# Altium PCB PCB_ESP_SparkBot_V1.1.pcbdoc (part 2 of 2)
Units mil, origin at the board's own origin, x right, y up, seen from the top; angles counter-clockwise.
Board outline 2353.91 x 3416.24 mil, 2 copper layers (Top Layer, Bottom Layer); 135 components, 107 nets, 461 pads, 252 vias.
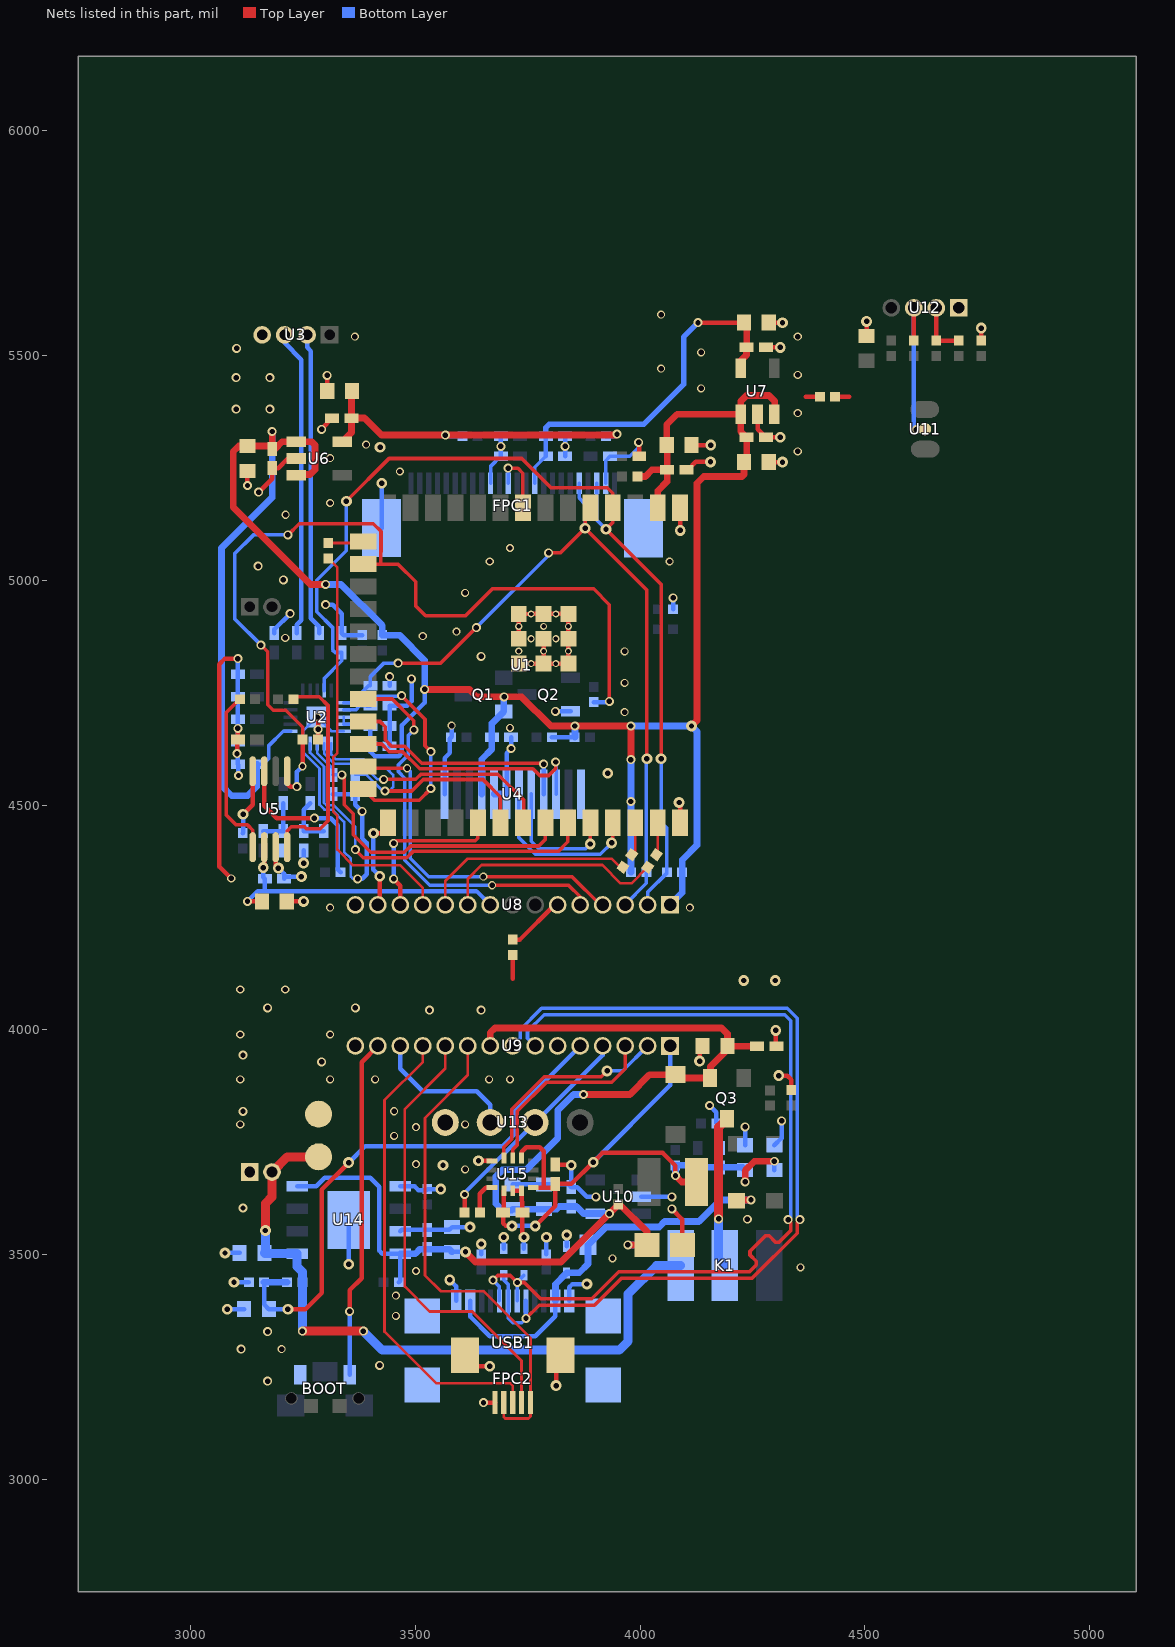
[diagram p2: the nets of this part, all layers, seen from the top]

## Via types
v1: diameter 20, hole 12, Top Layer to Bottom Layer, 106 vias
v2: diameter 24.02, hole 12.01, Top Layer to Bottom Layer, 64 vias
v3: diameter 18, hole 12, Top Layer to Bottom Layer, 57 vias
v4: diameter 20, hole 12.01, Top Layer to Bottom Layer, 12 vias
v5: diameter 15.75, hole 9.84, Top Layer to Bottom Layer, 12 vias
v6: diameter 18, hole 12.01, Top Layer to Bottom Layer, 1 vias

## Nets (pads, with @x,y where several pads share a name; then routed paths per layer and width w, separated by ;. In a path a pad name is that pad's centre, name@x,y a point inside that pad or via, vN(x,y) a via of type N, cw(c..) or ccw(c..) an arc to the next point about the centre after c; other vN are vias at no path point) (continued)
ESP_3V3: C6.2 C7.2 C14.1 C15.1 C20.2 C28.2 C29.2 C36.2 C38.2 C39.2 Q1.2 R3.2 R5.2 R15.2 R16.2 R22.1 R23.1 U1.2 U2.3 U2.4 U2.11 U4.4 U6.1 U6.3 U7.1 U7.3 U8.1 | length 5658.7
  Top Layer w15: v1(3181.82,5331.05) C29.2@3181.82,5292.51 ; U6.3@3235.63,5233.65 3237.43,5235.44 3266.21,5235.44 3276.82,5246.05 3276.82,5301.05 3269.42,5308.45 U6.1@3235.63,5308.45 3204.22,5308.45 3188.28,5292.51 C29.2@3181.82,5292.51 ; v1(3300.82,4991.05) 3266.82,4991.05 3095.02,5162.85 3095.02,5286.05 3107.58,5298.61 C28.2@3126.82,5298.61 3175.72,5298.61 C29.2@3181.82,5292.51 ; v1(3521.07,4757.42) 3620.44,4757.42 3636.82,4741.05 v1(3697.67,4741.05) 3736.82,4741.05 3801.82,4676.05 v1(3855.12,4676.05) v1(3979.78,4676.05) v1(3979.78,4601.06) ; R5.2@3993.86,5231.05 4011.82,5231.05 4026.82,5246.05 C7.2@4060.36,5246.05 ; U1.2@4039.36,5161.43 4039.36,5198.59 4060.36,5219.59 C7.2@4060.36,5246.05 ; v2(4114.49,4676.05) 4126.82,4688.37 4126.82,5216.05 4141.82,5231.05 4226.82,5231.05 4231.14,5235.37 C38.2@4231.14,5263.14 4237.24,5269.24 C39.2@4237.24,5318.14 4223.8,5331.58 U7.1@4223.8,5369.46 ; U7.3@4298.6,5369.46 4299.93,5370.78 4299.93,5397.94 4286.82,5411.05 4236.82,5411.05 4223.8,5398.03 U7.1@4223.8,5369.46 ; C7.2@4060.36,5246.05 4060.36,5299.95 C6.2@4059.26,5301.05 4059.26,5346.05 4082.67,5369.46 U7.1@4223.8,5369.46
  Bottom Layer w6: U2.4@3340.87,4680.3 U2.3@3340.87,4696.05
  Bottom Layer w8: C20.2@3148.28,4591.05 3161.82,4591.05 3173.83,4603.06 3173.83,4631.75 3206.64,4664.55 U2.11@3222.76,4664.55 ; U2.4@3340.87,4680.3 3396.1,4680.3 C15.1@3400.36,4676.05
  Bottom Layer w10: C15.1@3400.36,4676.05 C14.1@3400.36,4631.05 3400.36,4619.16 3410.36,4609.16 3463.13,4609.16 3470.43,4616.46 3470.43,4677.57 3521.07,4728.21 v1(3521.07,4757.42) ; R15.2@3803.86,4651.05 R16.2@3854.78,4651.05
  Bottom Layer w15: C20.2@3148.28,4591.05 3146.82,4589.59 3146.82,4541.05 3126.82,4521.05 3091.82,4521.05 3069.32,4543.55 3069.32,5071.88 3181.82,5184.38 v1(3181.82,5331.05) ; v1(3300.82,4991.05) 3335.07,4991.05 3426.82,4899.3 R3.2@3426.82,4878.09 3464.78,4878.09 3521.07,4821.79 v1(3521.07,4757.42) ; U4.4@3647.92,4524.75 3647.92,4602.15 3670.36,4624.59 C36.2@3670.36,4651.05 3670.36,4681.91 Q1.2@3697.09,4708.65 3697.09,4740.47 v1(3697.67,4741.05) ; R16.2@3854.78,4651.05 3855.12,4651.39 v1(3855.12,4676.05) ; R23.1@3979.78,4351.05 v1(3979.78,4508.06) v1(3979.78,4601.06) ; v1(3979.78,4676.05) v2(4114.49,4676.05) 4126.82,4663.72 4126.82,4411.05 4093.86,4378.09 R22.1@4093.86,4351.05 4093.86,4305.33 U8.1@4066.82,4278.29
GND1: C1.1 C2.1 C3.1 C4.1 C5.1 C6.1 C7.1 C8.1 C10.1 C12.1 C13.1 C14.2 C15.2 C16.1 C19.1 C20.1 C21.1 C22.1 C23.1 C24.1 C25.1 C27.1 C28.1 C29.1 C30.1 C31.1 C32.1 C33.1 C34.1 C36.1 C37.1 C38.1 C39.1 C40.1 C41.1 FPC1.2 FPC1.15 FPC1.25 FPC1.26 Q2.2 R4.1 R8.1 R13.1 R14.1 R40.1 R41.1 U1.1 U1.40 U1.41 U2.5 U2.10 U2.21 U3.4 U4.1 U4.5 U4.6 U4.12 U5.7 U6.2 U7.2 U8.6 U8.15 | length 4279.8
  Top Layer w10: v3(3090.82,4337.05) 3064.33,4363.54 3064.33,4813.56 3076.82,4826.05 v1(3105.36,4826.05) ; v1(3103.59,4614.75) 3103.59,4639.28 3110.36,4646.05 C32.1@3115.36,4646.05 ; C32.1@3105.36,4646.05 v1(3105.36,4671) ; v1(3126.82,5211.05) C28.1@3126.82,5243.49 ; v1(3151.82,5196.05) 3181.82,5226.05 C29.1@3181.82,5249.59 3195.36,5249.59 3216.82,5271.05 U6.2@3235.63,5271.05 ; U5.7@3189.61,4406.56 3189.61,4366.05 v2(3195.71,4359.94) ; C34.1@3214.38,4286.05 v2(3251.82,4286.05) ; v6(3281.82,4696.05) 3283.86,4694.02 v1(3283.86,4668.75) R14.1@3283.86,4646.05 ; v1(3291.82,5336.05) 3291.82,5337.51 C30.1@3315.36,5361.05 ; C31.1@3304.26,5421.05 v1(3304.26,5456.05) ; R40.1@3716.82,4201.04 3732.96,4201.04 3810.21,4278.29 U8.6@3816.82,4278.29 ; U1.41@3730.32,4870.08 v5(3730.32,4897.65) U1.41@3730.32,4925.2 v5(3757.88,4925.21) ; U1.41@3730.32,4814.96 v5(3757.88,4814.97) U1.41@3785.44,4814.96 ; v5(3757.88,4925.21) U1.41@3785.44,4925.2 v5(3813,4925.21) U1.41@3840.56,4925.2 v5(3840.56,4897.65) U1.41@3840.56,4870.08 v5(3840.56,4842.53) U1.41@3840.56,4814.96 v5(3813,4814.97) U1.41@3785.44,4814.96 ; U1.41@3785.44,4870.08 v5(3785.44,4842.53) U1.41@3785.44,4814.96 ; v4(3996.82,5307.1) 3998.28,5305.64 C19.1@3998.28,5276.05 ; v2(4086.82,4506.05) 4089.36,4503.5 U1.40@4089.36,4460.66 ; v2(4089.36,5111.05) U1.1@4089.36,5161.43 ; C7.1@4103.28,5246.05 4106.82,5246.05 4124.27,5263.5 v2(4156.82,5263.5) ; C6.1@4114.38,5301.05 4156.93,5301.05 v2(4157.15,5300.83) ; U7.2@4261.2,5369.46 4261.82,5368.84 4261.82,5336.49 C39.1@4280.16,5318.14 v2(4311.82,5318.14) ; C40.1@4280.16,5518.14 v2(4311.82,5518.14) ; C38.1@4286.26,5263.14 v2(4316.82,5263.14) ; C41.1@4286.26,5573.14 v2(4316.82,5573.14) ; 4368.82,5408 R41.1@4399.78,5408
  Bottom Layer w6: U2.5@3340.87,4664.55 3313.32,4664.55 v6(3281.82,4696.05) 3250.33,4664.56 U2.10@3250.33,4637 3250.33,4618.39 3287.19,4581.54 3287.19,4501.16 3298.32,4490.03 3314.43,4490.03 3341.82,4462.64 3341.82,4396.05 3356.82,4381.05 3356.82,4341.05 3361.82,4336.05 v1(3371.82,4336.05)
  Bottom Layer w8: FPC1.15@3667.59,5215.89 3667.59,5253.28 C3.1@3690.36,5276.05 ; FPC1.2@3923.49,5215.89 3923.49,5266.26 C1.1@3933.28,5276.05 3976.82,5276.05 3996.82,5296.05 v4(3996.82,5307.1)
  Bottom Layer w10: v1(3103.59,4614.75) 3105.36,4612.98 C20.1@3105.36,4591.05 3106.82,4589.59 v1(3106.82,4566.05) ; C22.1@3105.36,4641.05 v1(3105.36,4671) C21.1@3105.36,4691.05 C16.1@3105.36,4741.05 C13.1@3105.36,4791.05 v1(3105.36,4826.05) ; C12.1@3186.82,4882.51 3186.82,4891.05 v1(3221.82,4926.05) ; v2(3195.71,4359.94) 3208.28,4347.38 C33.1@3208.28,4336.05 3213.28,4341.05 v2(3246.82,4341.05) ; v2(3251.82,4371.05) C27.1@3251.82,4399.59 ; v1(3300.82,4946.05) 3316.82,4946.05 3336.82,4926.05 C10.1@3336.82,4882.51 3341.24,4878.09 R4.1@3381.82,4878.09 ; C25.1@3316.82,4524.59 C24.1@3366.82,4524.59 3366.82,4501.05 v1(3381.82,4486.05) 3381.82,4426.05 3391.82,4416.05 3391.82,4346.05 3381.82,4336.05 v1(3371.82,4336.05) ; FPC1.26@3425.44,5116.47 v2(3425.44,5216.05) ; C14.2@3443.28,4631.05 C15.2@3443.28,4676.05 C23.1@3443.28,4721.05 3481.82,4721.05 3491.82,4731.05 v1(3491.82,4781.05) ; C8.1@3443.28,4766.05 v1(3443.28,4786.05) ; U4.1@3565.24,4524.75 3565.24,4604.47 3576.82,4616.05 3576.82,4648.09 R13.1@3579.78,4651.05 3580.82,4652.09 v3(3580.82,4677.05) ; C3.1@3690.36,5276.05 v1(3690.36,5297.95) C2.1@3690.36,5321.05 ; U4.6@3703.04,4524.75 3703.04,4615.81 v1(3713.28,4626.05) C36.1@3713.28,4651.05 ; v1(3811.82,4708.65) Q2.2@3845.44,4708.65 ; C5.1@3833.28,5276.05 v1(3833.28,5297.91) C4.1@3833.28,5321.05 ; R8.1@4073.86,4936.05 v1(4073.86,4961.05)
  Bottom Layer w15: U4.5@3675.48,4524.75 U4.6@3703.04,4524.75
  other v1: 3646.82,4831.05 3206.82,5001.05 3150.82,5031.44 3101.82,5381.05 3176.82,5381.05 3101.82,5451.05 3176.82,5451.05 3102.92,5516.05
  other v2: 3928.39,4571.05 3421.82,5296.05
  other v3: 3310.82,4272.05 4110.82,4272.05 3710.82,4672.05 3965.82,4707.05 3965.82,4772.05 3965.82,4842.05 3210.82,4872.05 3516.82,4876.05 3591.82,4886.05 3610.82,4972.05 3665.82,5042.05 4065.82,5042.05 3710.82,5072.05 3211.82,5146.05 3310.82,5172.05 3465.82,5242.05 3310.82,5272.05 4350.82,5287.05 3390.82,5302.05 4350.82,5372.05 4135.82,5427.05 4350.82,5457.05 4046.82,5471.05 4135.82,5507.05 3365.82,5542.05 4350.82,5542.05 4046.82,5591.05
  other v5: 3730.32,4842.53 3757.88,4870.09 3813,4870.09 3785.44,4897.65
GND2: B-.1 BOOT.1 C42.1 C43.1 C44.1 C45.1 C47.1 C48.1 C49.1 C51.1 C52.1 C53.1 C54.1 C55.1 C56.1 C57.1 C58.1 CN2.1 ESD1.1 ESD2.1 ESD3.1 FPC2.5 FPC2.6 FPC2.7 R21.2 R27.2 R30.1 R34.1 R38.2 R39.2 R40.2 U9.6 U9.15 U10.2 U13.4 U14.1 U14.3 U14.9 U15.1 U15.6 U15.7 USB1.13 USB1.14 USB1.15 USB1.16 USB1.A1B12 USB1.B1A12 | length 1797.5
  Top Layer w10: FPC2.6@3620.36,3276.76 3620.36,3260.45 3628.82,3252 v2(3665.82,3252) ; v2(3640.76,3709) 3670.28,3709 U15.1@3670.76,3708.53 ; v1(3651.82,3171.24) FPC2.5@3677.45,3171.24 ; U15.6@3716.82,3642.78 U15.7@3736.51,3642.78 3736.51,3619.31 3738.28,3617.54 C56.1@3738.28,3594 3738.28,3542.54 v2(3741.82,3539) ; 3716.82,4114 R40.2@3716.82,4166.96 ; C58.1@3811.82,3700.46 3845.36,3700.46 v2(3846.82,3699) ; v2(3813.27,3209) FPC2.7@3813.27,3276.76 ; v1(4070.82,3602) 4094.19,3578.63 C42.1@4094.19,3522 ; v2(4132.5,3930.76) 4132.5,3957.24 C52.1@4139.26,3964 ; v2(4301.82,3999) 4301.82,3965.46 C51.1@4303.28,3964 ; v2(4308.4,3898.49) 4327.33,3898.49 4336.82,3889 R38.2@4336.82,3866.04
  Bottom Layer w10: v2(3076.82,3504) C57.1@3109.26,3504 ; v2(3081.82,3379) C55.1@3119.26,3379 ; v2(3096.82,3439) R39.2@3129.78,3439 ; v2(3352.04,3479) U14.9@3352.04,3577.36 ; U14.3@3466.54,3552.36 3469.64,3555.46 C54.1@3526.82,3555.46 3575.72,3555.46 C53.1@3581.82,3561.56 v2(3621.82,3561.56) ; U14.1@3466.54,3652.36 3498.46,3652.36 3506.82,3644 3524.78,3644 R34.1@3526.82,3646.04 v2(3556.82,3646.04) ; v2(3576.82,3444) 3590.83,3429.99 USB1.B1A12@3590.83,3397.69 ; R27.2@3646.82,3501.04 v2(3646.82,3524) ; ESD3.1@3696.82,3513.53 v2(3696.82,3539) ; C43.1@3716.82,3656.56 C44.1@3786.82,3656.56 3840.72,3656.56 C45.1@3846.82,3650.46 ; ESD2.1@3741.82,3513.53 v2(3741.82,3539) ; R21.2@3791.82,3501.04 v2(3791.82,3539) ; ESD1.1@3836.82,3518.53 v2(3836.82,3544) ; USB1.A1B12@3842.8,3397.7 3842.8,3427.99 3848.82,3434 3880.82,3434 v2(3881.82,3435) ; v2(3846.82,3699) C45.1@3846.82,3650.46 ; v1(3901.82,3629) 3881.82,3629 3860.36,3650.46 C45.1@3846.82,3650.46 ; U10.2@4003,3629 v1(4070.82,3629) ; v1(4154.82,3832) 4169.86,3816.96 R30.1@4169.86,3792 ; C48.1@4233.82,3743.56 v1(4233.82,3784.71) ; C49.1@4298.82,3743.56 4314.82,3759.56 v1(4314.82,3798)
  other v1: 3171.82,3219 3420.87,3254 3112.82,3290 3171.82,3329 4238.82,3579 3116.82,3604 3116.82,3819 3291.82,3929 3116.82,3944 3531.82,4044 3646.82,4044 3171.82,4049 3366.82,4049
  other v2: 3561.82,3699 4230.82,4110 4300.82,4110
  other v3: 3202.82,3290 3456.82,3364 3456.82,3409 3501.82,3464 4356.82,3472 3938.82,3492 3610.82,3690 3501.82,3701.52 3453.05,3764.39 3501.82,3784 3110.82,3790 3610.82,3790 3453.05,3819.24 3110.82,3890 3310.82,3890 3410.82,3890 3664.27,3890 3710.82,3890 3110.82,3990 3310.82,3990 3110.82,4090 3210.82,4090
GND3: C50.1 R32.1 R41.2 U12.1 | length 91.4
  Top Layer w10: R41.2@4433.86,5408 4464.82,5408 ; C50.1@4503.91,5543.61 v2(4503.91,5576.05) ; R32.1@4758.91,5533.09 v2(4758.91,5561.05)
GPIO0: U1.27 U8.14 | length 219.4
  Top Layer w10: v2(3407.12,4437.38) 3428.15,4437.38 3439.36,4448.59 U1.27@3439.36,4460.66 ; U8.14@3416.82,4278.29 3414.21,4278.29 3421.23,4285.31 v2(3421.23,4341.98)
  Bottom Layer w10: v2(3407.12,4437.38) 3407.12,4356.09 v2(3421.23,4341.98)
GPIO1: R7.1 U1.39 | length 71.8
  Top Layer w6: R7.1@4036.59,4390.01 4039.36,4392.78 U1.39@4039.36,4460.66
GPIO2: R9.1 U1.38 | length 73.9
  Top Layer w6: R9.1@3981.59,4390.01 3989.36,4397.78 U1.38@3989.36,4460.66
GPIO3: R10.1 U1.15 | length 78.7
  Top Layer w6: R10.1@3306.82,5083.09 3381.32,5083.09 U1.15@3384.27,5086.04
GPIO4: C10.2 FPC1.3 R22.2 U1.4 U2.19 U8.2 | length 2266.7
  Top Layer w8: v2(3346.82,5176.05) 3441.82,5271.05 3736.82,5271.05 3801.82,5206.05 3926.82,5206.05 3939.36,5193.5 U1.4@3939.36,5161.43 3939.36,5128.59 v2(3924.32,5113.55) 4046.82,4991.05 v2(4046.82,4603.06)
  Bottom Layer w8: U2.19@3297.56,4755.11 3297.56,4781.79 3336.82,4821.05 C10.2@3336.82,4839.59 3321.82,4839.59 3316.16,4845.24 3316.16,4895.09 3280.82,4930.43 3280.82,5000.05 3346.82,5066.05 v2(3346.82,5176.05) ; FPC1.3@3903.79,5215.89 3903.79,5134.07 v2(3924.32,5113.55) ; U8.2@4016.82,4278.29 4016.82,4306.05 4059.78,4349.01 R22.2@4059.78,4351.05 4059.78,4448.09 4046.82,4461.05 v2(4046.82,4603.06)
GPIO5: C8.2 FPC1.5 R23.2 U1.5 U2.1 U8.3 | length 1782.8
  Top Layer w8: v1(3461.82,4816.05) 3556.82,4816.05 v1(3635.75,4894.98) ; v1(3796.82,5061.05) 3822.8,5061.05 v2(3877.8,5116.05) ; U1.5@3889.36,5161.43 3877.8,5149.87 v2(3877.8,5116.05) ; v2(4015.29,4603.06) 4015.29,4978.56 v2(3877.8,5116.05)
  Bottom Layer w8: U2.1@3340.87,4727.55 3358.32,4727.55 3396.82,4766.05 C8.2@3400.36,4766.05 3400.36,4786.05 3430.36,4816.05 v1(3461.82,4816.05) ; v1(3635.75,4894.98) 3796.82,5056.05 v1(3796.82,5061.05) ; FPC1.5@3864.49,5215.89 3864.49,5183.37 3877.8,5170.06 v2(3877.8,5116.05) ; U8.3@3966.82,4278.29 3966.82,4279.01 4013.86,4326.05 R23.2@4013.86,4351.05 4013.86,4601.64 v2(4015.29,4603.06)
GPIO14: U1.22 U8.5 | length 904.4
  Top Layer w8: U1.22@3384.27,4736.04 3448.81,4736.04 3496.82,4688.03 v1(3496.82,4667.59) ; v3(3670.89,4321.98) 3840.89,4321.98 3866.82,4296.05 U8.5@3866.82,4278.29
  Bottom Layer w8: v1(3496.82,4667.59) 3484.29,4655.06 3484.29,4611.46 3462.86,4590.03 3462.86,4574.29 3476.95,4560.2 3476.95,4377.18 3532.15,4321.98 v3(3670.89,4321.98)
GPIO15: FPC1.13 U1.8 | length 147.8
  Top Layer w8: v1(3706.78,5249.43) 3728.43,5249.43 3739.36,5238.5 U1.8@3739.36,5161.43
  Bottom Layer w8: v1(3706.78,5249.43) 3706.78,5216.1 FPC1.13@3706.99,5215.89
GPIO21: U1.23 U4.9 | length 524.3
  Top Layer w8: U1.23@3384.27,4686.04 3421.82,4686.04 3433.28,4674.58 3433.28,4645.18 3447.41,4631.05 3476.81,4631.05 3514.81,4593.05 3783.72,4593.05 v1(3785.72,4591.05)
  Bottom Layer w10: U4.9@3785.72,4524.75 v1(3785.72,4591.05)
GPIO38: U1.31 U8.13 | length 369.4
  Top Layer w8: v1(3451.82,4415.14) 3457.82,4421.13 3633.81,4421.13 3639.36,4426.69 U1.31@3639.36,4460.66
  Top Layer w10: v1(3451.82,4336.05) 3466.82,4321.05 U8.13@3466.82,4278.29
  Bottom Layer w10: v1(3451.82,4336.05) v1(3451.82,4415.14)
GPIO39: C24.2 U1.32 U2.6 | length 651
  Top Layer w8: v1(3432.77,4531.59) 3492.36,4531.59 3517.82,4557.05 3650.82,4557.05 3689.36,4518.5 U1.32@3689.36,4460.66
  Bottom Layer w6: U2.6@3313.32,4637 3313.32,4612.83 3324.09,4602.06 3385.55,4602.06 3406.56,4581.05 3436.82,4581.05 3450.86,4567 3450.86,4540.09 3442.36,4531.59 v1(3432.77,4531.59) 3427.74,4531.59 3391.82,4567.51 C24.2@3366.82,4567.51
GPIO40: U1.33 U2.7 | length 570.5
  Top Layer w8: v1(3429.8,4557.59) 3501.39,4557.59 3512.85,4569.05 3683.82,4569.05 3741.82,4511.05 3741.82,4463.12 U1.33@3739.36,4460.66
  Bottom Layer w6: U2.7@3297.57,4637 3297.57,4614.43 3319.95,4592.06 3381.41,4592.06 3415.88,4557.59 v1(3429.8,4557.59)
GPIO41: C25.2 U1.34 U2.8 | length 740.2
  Top Layer w8: v1(3336.82,4567.51) 3341.82,4562.51 3341.82,4501.05 3361.82,4481.05 3361.82,4434.33 3401.02,4395.14 3475.91,4395.14 3489.91,4409.13 3774.91,4409.13 3789.36,4423.59 U1.34@3789.36,4460.66
  Bottom Layer w6: U2.8@3281.82,4637 3281.82,4616.04 3316.82,4581.05 C25.2@3316.82,4567.51
  Bottom Layer w8: C25.2@3316.82,4567.51 v1(3336.82,4567.51)
GPIO42: U1.35 U2.9 | length 823.8
  Top Layer w8: v1(3366.82,4401.05) 3384.73,4383.14 3480.88,4383.14 3494.88,4397.13 3817.91,4397.13 3839.36,4418.59 U1.35@3839.36,4460.66
  Bottom Layer w6: U2.9@3266.08,4637 3266.08,4616.78 3297.19,4585.68 3297.19,4505.31 3302.46,4500.03 3318.57,4500.03 3366.82,4451.79 v1(3366.82,4401.05)
GPIO43: U1.37 U4.7 | length 374.7
  Top Layer w8: v2(3936.82,4416.05) 3939.36,4418.59 U1.37@3939.36,4460.66
  Bottom Layer w8: U4.7@3730.6,4524.75 3730.6,4427.27 3766.82,4391.05 3911.82,4391.05 v2(3936.82,4416.05)
GPIO44: U1.36 U4.8 | length 294.6
  Top Layer w8: v2(3889.36,4413.61) U1.36@3889.36,4460.66
  Bottom Layer w8: U4.8@3758.16,4524.75 3758.16,4419.71 3774.82,4403.05 3878.8,4403.05 v2(3889.36,4413.61)
GPIO45: C23.2 U1.26 U2.2 | length 551.3
  Top Layer w8: U1.26@3384.27,4536.04 3409.27,4511.05 3508.95,4511.05 v1(3534.95,4537.05) ; v1(3469.59,4743.55) 3521.82,4691.32 3521.82,4632.36 v1(3534.95,4619.23)
  Bottom Layer w8: U2.2@3340.87,4711.8 3367.57,4711.8 3376.82,4721.05 C23.2@3391.82,4721.05 ; C23.2@3400.36,4721.05 3400.36,4727.96 3415.08,4742.68 3468.72,4742.68 v1(3469.59,4743.55) ; v1(3534.95,4537.05) v1(3534.95,4619.23)
  Bottom Layer w10: C23.2@3391.82,4721.05 C23.2@3400.36,4721.05
GPIO46: R14.2 R19.1 U1.16 U5.1 | length 2004.6
  Top Layer w8: v1(3156.82,4856.05) 3171.82,4841.05 3171.82,4723.1 3183.87,4711.05 3211.82,4711.05 3249.78,4673.09 R14.2@3249.78,4646.05 ; v1(3216.82,5101.05) 3241.82,5126.05 3406.82,5126.05 3423.7,5109.17 3423.7,5108 3423.8,5107.9 3423.8,5064.18 3423.7,5064.08 3423.7,5036.04 ; U1.16@3384.27,5036.04 3423.7,5036.04 ; v4(3931.82,4731.05) 3931.82,4946.05 3896.82,4981.05 3671.82,4981.05 3611.82,4921.05 3522.96,4921.05 3501.16,4942.85 3501.16,4996.71 3461.82,5036.04 3423.7,5036.04
  Top Layer w10: U5.1@3215.21,4575.54 3215.21,4547.66 3221.82,4541.05 v1(3236.82,4541.05) ; v3(3249.37,4586.49) 3249.37,4645.64 R14.2@3249.78,4646.05
  Bottom Layer w8: v1(3156.82,4856.05) 3098.82,4914.05 3098.82,5059.66 3140.2,5101.05 v1(3216.82,5101.05)
  Bottom Layer w10: v1(3236.82,4541.05) 3236.82,4573.93 v3(3249.37,4586.49) ; R19.1@3896.82,4729.01 3929.78,4729.01 v4(3931.82,4731.05)
GPIO47: U1.24 U4.10 | length 549.7
  Top Layer w8: U1.24@3384.27,4636.04 3425.45,4636.04 3442.44,4619.05 3471.84,4619.05 3509.84,4581.05 3761.82,4581.05 3776.82,4566.05 3796.82,4566.05 3812.48,4581.7 v1(3812.48,4596.05)
  Bottom Layer w8: v1(3812.48,4596.05) 3813.28,4595.25 U4.10@3813.28,4524.75
GPIO48: U1.25 U8.4 | length 773
  Top Layer w8: U1.25@3384.27,4586.04 3388.16,4582.16 v3(3481.86,4582.16) ; v3(3651.69,4340.98) 3848.86,4340.98 3911.55,4278.29 U8.4@3916.82,4278.29
  Bottom Layer w8: v3(3481.86,4582.16) 3488.95,4575.07 3488.95,4382.15 3530.05,4341.05 3651.62,4341.05 v3(3651.69,4340.98)
IMU_INT: R24.1 U15.4 | length 74.5
  Top Layer w10: R24.1@3643.86,3594 3643.86,3636.04 3656.82,3649 3670.29,3649 U15.4@3670.76,3649.47
IMU_SCL: U9.3 U15.13 | length 437.8
  Top Layer w8: U15.13@3716.82,3715.22 3716.82,3734 3726.82,3744 3726.82,3819 3791.82,3884 3936.82,3884 3966.82,3914 U9.3@3966.82,3964.51
IMU_SDA: U9.2 U15.14 | length 476.3
  Top Layer w8: U15.14@3697.14,3715.22 3697.14,3739.32 3714.8,3756.98 3714.8,3823.98 3786.84,3896.02 3913.83,3896.02 v2(3926.82,3909)
  Bottom Layer w8: v2(3926.82,3909) 3961.31,3909 U9.2@4016.82,3964.51
MICN: C11.1 U3.3 | length 683.1
  Bottom Layer w10: U3.3@3209.54,5546.05 3209.54,5528.33 3246.82,5491.05 3246.82,4911.05 3236.82,4901.05 C11.1@3236.82,4882.51
MICN_SUB: R29.1 R31.1 U12.2 | length 123
  Top Layer w10: U12.2@4658.91,5606.05 R29.1@4658.91,5533.09 R31.1@4708.91,5533.09
MICP: C9.1 U3.2 | length 674.8
  Bottom Layer w10: U3.2@3259.54,5546.05 3259.54,5518.33 3267.82,5510.05 3267.82,4915.65 3286.82,4896.65 C9.1@3286.82,4882.51
MICP_SUB: R28.1 U11.1 U12.3 | length 366.1
  Top Layer w10: R28.1@4608.91,5533.09 U12.3@4608.91,5606.05 ; v4(4614.49,5335.09) 4615.61,5336.21 U11.1@4633.9,5336.21
  Bottom Layer w10: U12.3@4608.91,5606.05 4608.91,5340.68 v4(4614.49,5335.09)
OUTN: C17.1 C35.2 C37.2 | length 107.1
  Bottom Layer w10: C35.2@3161.82,4442.51 C37.2@3206.82,4442.51 C17.1@3206.82,4504.59
OUTP: C18.1 C26.2 C27.2 | length 113.3
  Bottom Layer w10: C18.1@3266.82,4504.59 3251.82,4489.59 C27.2@3251.82,4442.51 C26.2@3296.82,4442.51
PA_INL+: R11.1 U5.3 | length 365.1
  Top Layer w10: U5.3@3164.02,4575.54 3164.02,4498.85 3191.82,4471.05 v1(3275.65,4471.05)
  Bottom Layer w10: v1(3275.65,4471.05) 3311.82,4471.05 3327.71,4455.15 3327.71,4357.19 R11.1@3333.86,4351.05
PA_INL-: R17.1 U5.4 | length 146.4
  Top Layer w10: v2(3117.16,4479.86) 3138.43,4501.13 U5.4@3138.43,4575.54
  Bottom Layer w10: R17.1@3116.82,4438.09 3117.16,4438.43 v2(3117.16,4479.86)
PA_OUTL+: R12.1 U5.8 | length 483.4
  Top Layer w8: U5.8@3215.21,4406.56 3215.21,4442.74 3224.27,4451.79 3253.9,4451.79 3257.9,4447.79 3288.57,4447.79 3305.99,4465.22 3305.99,4721.87 3286.82,4741.05 3233.86,4741.05 R12.1@3228.86,4736.05
PA_OUTL-: R18.1 U5.5 | length 381.2
  Top Layer w8: R18.1@3109.78,4736.05 3079.81,4706.07 3079.81,4478.06 3101.82,4456.05 3126.82,4456.05 3138.89,4443.98 3138.89,4407.02 U5.5@3138.43,4406.56
SUB_GPIO0: BOOT.3 U9.14 | length 756.8
  Top Layer w10: v1(3354.29,3374) 3354.29,3421.47 3380.82,3448 3380.82,3928.51 U9.14@3416.82,3964.51
  Bottom Layer w10: BOOT.3@3354.29,3233.63 v1(3354.29,3374)
SUB_GPIO38: U9.13 U13.3 | length 323.4
  Bottom Layer w10: U9.13@3466.82,3964.51 3466.82,3914 3516.82,3864 3636.82,3864 3666.82,3834 U13.3@3666.82,3794.24
SUB_GPIO48: R24.2 U9.4 U13.2 | length 497.7
  Top Layer w10: R24.2@3609.78,3594 v1(3609.78,3634)
  Bottom Layer w10: v1(3609.78,3634) 3609.78,3637.2 U13.2@3766.82,3794.24 3916.82,3944.24 U9.4@3916.82,3964.51
TOUCH_BTN1: FPC2.1 FPC2.4 U9.10 | length 1111
  Top Layer w6: U9.10@3616.82,3964.51 3616.82,3899.39 3521.82,3804.39 3521.82,3454 3556.82,3419 3651.82,3419 3756.34,3314.47 3756.34,3171.4 FPC2.1@3756.19,3171.24 3756.19,3140.18 3751.82,3135.81 3700.32,3135.81 3697.13,3139 FPC2.4@3697.13,3171.24
TOUCH_BTN2: FPC2.2 U9.11 | length 993.8
  Top Layer w6: U9.11@3566.82,3964.51 3566.82,3914 3476.82,3824 3476.82,3429 3531.82,3374 3626.82,3374 3736.5,3264.32 FPC2.2@3736.5,3171.24
TOUCH_BTN3: FPC2.3 U9.12 | length 1043.2
  Top Layer w6: U9.12@3516.82,3964.51 3516.82,3929 3431.82,3844 3431.82,3329 3546.82,3214 3711.82,3214 3716.82,3209 FPC2.3@3716.82,3171.24
TP_GPIO1: R7.2 U8.10 | length 502.5
  Top Layer w6: U8.10@3616.82,4278.29 3616.82,4336.05 3647.49,4366.72 3916.15,4366.72 3956.82,4326.05 3981,4326.05 R7.2@4017.05,4362.09
TP_GPIO2: R9.2 U8.11 | length 476.5
  Top Layer w6: U8.11@3566.82,4278.29 3566.82,4331.05 3616.82,4381.05 3936.82,4381.05 3955.78,4362.09 R9.2@3962.05,4362.09
TP_GPIO3: R10.2 U8.12 | length 926.7
  Top Layer w6: R10.2@3306.82,5049.01 3326.82,5029.01 3326.82,4616.05 3317.82,4607.05 3317.82,4485.05 3326.82,4476.05 3326.82,4401.05 3361.82,4366.05 3466.82,4366.05 3516.82,4316.05 U8.12@3516.82,4278.29
USB_5V: D1.2 D2.1 ESD1.2 USB1.A4B9 USB1.B4A9 | length 902
  Top Layer w15: D2.1@4214.82,3620.61 4216.21,3622 v1(4246.82,3622)
  Bottom Layer w10: USB1.B4A9@3622.32,3397.7 3622.32,3362.68 3666,3319 3766.82,3319 3811.3,3363.49 USB1.A4B9@3811.3,3397.7
  Bottom Layer w15: USB1.A4B9@3811.3,3397.7 3811.82,3398.22 3811.82,3434.47 ESD1.2@3836.82,3459.47 3837.34,3460 3864.82,3460 3884.19,3479.37 D1.2@3884.19,3522 3924.19,3562 4042.82,3562 4054.82,3574 4130.82,3574 4178.82,3622 v1(4246.82,3622)
USB_D+: ESD2.2 U9.7 USB1.A6 USB1.B6 | length 2032.9
  Top Layer w8: v4(3672.96,3443.42) 3683.54,3454 3711.39,3454 v4(3726.97,3438.42) 3742.4,3438.42 3778.82,3402 3892.82,3402 3952.82,3462 4243.41,3462 4258.82,3477.41 4258.82,3485.41 4244.65,3499.57 4244.65,3507.57 4279.08,3542 4287.08,3542 4301.24,3527.84 4309.24,3527.84 4335.41,3554 4335.41,3572 v1(4329.41,3578)
  Bottom Layer w8: v4(3672.96,3443.42) 3687.28,3429.1 USB1.B6@3687.28,3397.7 ; USB1.A6@3726.65,3397.7 3726.82,3397.87 3726.82,3438.26 v4(3726.97,3438.42) 3726.97,3439.63 ESD2.2@3741.82,3454.47 ; U9.7@3766.82,3964.51 3749.82,3981.51 3749.82,3997 3786.82,4034 4321.82,4034 4335.41,4020.41 4335.41,3584 v1(4329.41,3578)
USB_D-: ESD3.2 U9.8 USB1.A7 USB1.B7 | length 2038.4
  Top Layer w8: v4(3746.34,3358.53) 3775.82,3388 3898.62,3388 3958.62,3448 4249.21,3448 4349.41,3548.2 4349.41,3572 v1(4355.41,3578)
  Bottom Layer w8: ESD3.2@3696.82,3454.47 3696.82,3444 3706.97,3433.84 USB1.A7@3706.97,3397.7 3706.97,3359 3716.97,3349 3736.82,3349 v4(3746.34,3358.53) ; U9.8@3716.82,3964.51 3733.82,3981.51 3733.82,4000.8 3781.02,4048 4327.62,4048 4349.41,4026.21 4349.41,3584 v1(4355.41,3578)
  Bottom Layer w10: v4(3746.34,3358.53) USB1.B7@3746.34,3397.7
VBAT: B+.1 C57.2 CN2.2 K1.1 R36.1 U14.5 | length 1554.6
  Top Layer w20: v2(3166.82,3554) 3166.82,3614 3181.42,3628.61 CN2.2@3181.43,3684 3215.38,3717.96 B+.1@3285.09,3717.96 ; v1(3248.82,3330) v1(3384.82,3330)
  Bottom Layer w20: v2(3166.82,3554) 3166.82,3506.44 C57.2@3164.38,3504 3166.02,3502.36 U14.5@3237.54,3502.36 3236.82,3501.64 3236.82,3474 3248.86,3461.96 R36.1@3248.86,3439 ; v1(3248.82,3330) R36.1@3248.82,3438.96 ; v1(3384.82,3330) 3426.82,3288 3953.76,3288 3973.76,3308 3973.76,3412.95 4036.82,3476 K1.1@4090.39,3476
VBAT_ADC: C55.2 R36.2 R39.1 U9.5 | length 1214.5
  Top Layer w10: v2(3216.82,3379) 3255.82,3379 3291.82,3415 3291.82,3645.01 v2(3351.81,3705)
  Bottom Layer w10: R39.1@3163.86,3439 3163.86,3389.52 C55.2@3174.38,3379 v2(3216.82,3379) ; v2(3351.81,3705) 3388.34,3741.53 3694.31,3741.53 3721.82,3769.04 3721.82,3819.51 U9.5@3866.82,3964.51
  Bottom Layer w15: R39.1@3163.86,3439 R36.2@3214.78,3439
VBAT_OUT: K1.2 Q3.3 | length 340
  Top Layer w20: v1(4174.82,3580) 4174.82,3784.1 Q3.3@4193.26,3802.54
  Bottom Layer w20: v1(4174.82,3580) 4174.82,3490 K1.2@4188.82,3476
VBUS: C42.2 C43.2 C44.2 C45.2 C51.2 C52.2 C53.2 C54.2 D1.1 D4.1 Q3.2 R20.2 R35.2 U9.9 U10.4 U14.4 U14.8 | length 2900.3
  Top Layer w15: v2(3611.82,3506.44) 3634.26,3484 3824.22,3484 v1(3931.82,3591.6) 3951.82,3611.6 R20.2@3951.82,3611.96 3954.86,3611.96 4015.45,3551.37 C42.2@4015.45,3522 v1(3972.82,3522) ; U9.9@3666.82,3964.51 3666.82,3994 3677.43,4004.61 4181.21,4004.61 4194.38,3991.44 C52.2@4194.38,3964 ; v1(3874.32,3856.5) 3977.32,3856.5 4021.45,3900.63 D4.1@4078.82,3900.63 4086.35,3893.09 Q3.2@4155.86,3893.09 4156.82,3894.05 4156.82,3919 4194.38,3956.56 C52.2@4194.38,3964 ; C51.2@4260.36,3964 C52.2@4194.38,3964
  Bottom Layer w10: U14.8@3237.54,3652.36 3280.18,3652.36 3298.89,3671.07 3399.75,3671.07 3419.75,3651.07 3419.75,3509.43 3426.82,3502.36 U14.4@3466.54,3502.36 3466.54,3441.68 R35.2@3463.86,3439 ; C53.2@3581.82,3506.44 v2(3611.82,3506.44)
  Bottom Layer w15: U14.4@3466.54,3502.36 3500.18,3502.36 3510.36,3512.54 C54.2@3526.82,3512.54 3575.72,3512.54 C53.2@3581.82,3506.44 ; v1(3874.32,3856.5) 3852.42,3856.5 3816.82,3820.9 3816.82,3759 3746.82,3689 3694.06,3689 3679.06,3674 3679.06,3614 3694.06,3599 3714.38,3599 C43.2@3716.82,3601.44 C44.2@3786.82,3601.44 3814.26,3601.44 3820.36,3607.54 C45.2@3846.82,3607.54 3858.28,3607.54 3874.22,3591.6 U10.4@3900.63,3591.6 v1(3931.82,3591.6) ; v1(3972.82,3522) D1.1@4017.45,3522
VDD_1V5: C4.2 C5.2 C40.2 C41.2 FPC1.10 U7.5 | length 842.2
  Top Layer w10: v1(4128.91,5573.14) C41.2@4231.14,5573.14
  Top Layer w15: U7.5@4223.8,5471.83 4223.8,5488.03 4236.82,5501.05 4236.82,5517.72 C40.2@4237.24,5518.14 4237.24,5567.04 C41.2@4231.14,5573.14
  Bottom Layer w8: FPC1.10@3766.04,5215.89 3766.04,5251.73 C5.2@3790.36,5276.05
  Bottom Layer w10: C5.2@3790.36,5276.05 C4.2@3790.36,5321.05
  Bottom Layer w12: C4.2@3790.36,5321.05 3790.36,5339.59 3797.87,5347.1 4007.87,5347.1 4096.82,5436.05 4096.82,5541.05 v1(4128.91,5573.14)
VDD_2V8: C30.2 C31.2 R1.1 R2.1 U6.5 | length 794.1
  Top Layer w15: U6.5@3338,5308.45 3358.28,5328.72 C30.2@3358.28,5361.05 ; C31.2@3359.38,5421.05 3358.28,5419.95 C30.2@3358.28,5361.05 ; v1(3948.86,5325.1) 3946.86,5323.1 v1(3566.82,5323.1) 3424.76,5323.1 3386.82,5361.05 C30.2@3358.28,5361.05
  Bottom Layer w10: v1(3566.82,5323.1) 3568.87,5321.05 R2.1@3604.78,5321.05 ; R1.1@3923.86,5321.05 3944.8,5321.05 v1(3948.86,5325.1)
VDD_3V3: C46.2 C47.2 C48.2 C49.2 C56.2 C58.2 L1.2 R25.2 U9.1 U15.5 U15.8 U15.12 | length 1501.6
  Top Layer w10: U15.5@3697.14,3642.78 3697.14,3595.78 C56.2@3695.36,3594 3695.36,3570.46 3701.82,3564 v2(3715.29,3564) ; U15.12@3736.51,3715.22 3736.82,3715.53 3736.82,3729 3746.82,3739 3776.82,3739 3785.68,3730.14 3785.68,3649.47 ; U15.8@3762.88,3649.47 3785.68,3649.47 ; v2(3766.82,3564) 3811.82,3609 C58.2@3811.82,3657.54 ; v1(4078.82,3676) 4078.82,3698 4050.28,3726.54 3916.36,3726.54 v2(3895.82,3706) 3847.36,3657.54 C58.2@3811.82,3657.54 ; 3785.68,3649.47 3803.74,3649.47 C58.2@3811.82,3657.54
  Top Layer w15: v1(4078.82,3676) 4092.82,3662 L1.2@4125.97,3662 ; v1(4233.82,3662) 4233.82,3687 4254.82,3708 v1(4298.82,3708)
  Bottom Layer w10: v2(3715.29,3564) v2(3766.82,3564) ; v2(3895.82,3706) 4066.82,3877 U9.1@4066.82,3964.51 ; v1(4233.82,3662) C48.2@4233.82,3688.44 ; C49.2@4298.82,3688.44 v1(4298.82,3708)
  Bottom Layer w15: v1(4078.82,3676) R25.2@4078.82,3698.96 4124.4,3698.96 C46.2@4128.82,3694.54 C47.2@4178.82,3694.54 4227.72,3694.54 C48.2@4233.82,3688.44
VOUT: C33.2 C34.2 U5.6 U8.9 | length 694.9
  Top Layer w10: v1(3126.82,4286.05) C34.2@3159.26,4286.05 ; v2(3161.82,4361.05) 3164.02,4363.25 U5.6@3164.02,4406.56
  Bottom Layer w10: v1(3126.82,4286.05) 3149.75,4308.98 3164.8,4308.98 ; v2(3161.82,4361.05) 3161.82,4339.59 C33.2@3165.36,4336.05 3165.36,4309.53 3164.8,4308.98 ; U8.9@3666.82,4278.29 3636.13,4308.98 3261.43,4308.98 3261.35,4309.06 3242.29,4309.06 3242.21,4308.98 3164.8,4308.98
pads on no net: BOOT.2 BOOT.4 BOOT.5 FPC1.1 FPC1.23 FPC1.24 K1.3 U1.28 U1.29 U1.30 U6.4 U7.4 U14.6 U15.2 U15.3 U15.9 U15.10 U15.11 USB1.A8 USB1.B8

## Polygon pours and split planes (outlines as drawn)
GND3 on Bottom Layer (solid, remove dead copper, pour order 6): 4456.91,5671.05 4853.91,5671.05 4853.91,5181.05 4456.91,5181.05
GND3 on Top Layer (solid, remove dead copper, pour order 0): 4456.91,5661.05 4843.91,5661.05 4843.91,5196.05 4456.91,5196.05
GND1 on Bottom Layer (solid, remove dead copper, pour order 8): 3014.06,5663.82 4375.62,5663.82 4375.62,4224.09 3014.06,4224.09
GND1 on Top Layer (solid, remove dead copper, pour order 2): 3000,5674 4376.82,5674 4376.82,4212.05 3000,4212.05
GND2 on Top Layer (solid, remove dead copper, pour order 4): 3004.82,4208 3232.06,4208 3256.06,4184 3256.06,4126.76 4187.25,4126.76 4187.25,4202.43 4188.82,4204 4404.82,4204 4434.82,4174 4434.82,3194 4272.82,3032 3076.82,3032 3002.82,3106 3002.82,4206
GND2 on Bottom Layer (solid, remove dead copper, pour order 10): 3018.82,4204 3236.06,4204 3256.06,4184 3256.06,4126.2 4186.82,4126.2 4186.82,4198 4192.82,4204 4390.82,4204 4454.82,4140 4454.82,3138 4316.82,3000 3056.82,3000 3016.82,3040 3016.82,4202

## Keep-outs
Board Outline Layer:
  lines w10: 3047.38,4538.25 3047.38,4623.71 3047.53,5549.94 cw(c3086.9,5549.94) 3086.9,5589.31 3128.63,5589.31 3340.44,5589.31 3382.17,5589.31 cw(c3382.17,5549.94) 3421.54,5549.94 3421.54,5404.27 ccw(c3460.91,5404.27) 3460.91,5364.9 3972.72,5364.9 ccw(c3972.72,5404.27) 4012.09,5404.27 4012.09,5601.12 cw(c4051.46,5601.12) 4051.46,5640.49 4346.74,5640.49 cw(c4346.74,5601.12) 4386.11,5601.12 4386.11,5505.87 4446.42,5505.87 4446.42,5587.72 4446.42,5602.72 cw(c4485.79,5602.72) 4485.79,5642.09 4737.36,5642.09 cw(c4737.36,5602.72) 4776.07,5609.88 4819.77,5373.66 cw(c4781.06,5366.5) 4820.43,5366.5 4820.43,5248.39 cw(c4781.06,5248.39) 4781.06,5209.02 4485.79,5209.02 cw(c4485.79,5248.39) 4446.42,5248.39 4446.42,5319.08 4386.11,5319.08 4386.11,5206.05 4148.3,5206.05 4148.3,4421.2 4148.3,4231.05 3801.48,4231.05 3801.48,4136.76 4187.25,4136.76 4187.25,4184 4251.17,4184 4346.74,4184 cw(c4346.74,4144.63) 4386.11,4144.63 4386.11,3396 4010.82,3396 4010.82,3207.62 3984.53,3207.62 ccw(c3984.53,3184) 3960.91,3184 3960.91,3136.76 cw(c3945.16,3136.76) 3945.16,3121.01 3488.47,3121.01 cw(c3488.47,3136.76) 3472.72,3136.76 3472.72,3184 ccw(c3449.1,3184) 3425.48,3184 3425.48,3136.76 cw(c3409.73,3136.76) 3409.73,3121.01 3295.56,3121.01 cw(c3295.56,3369.04) 3047.53,3369.04 3047.53,4144.63 cw(c3086.9,4144.63) 3086.9,4184 3182.46,4184 3256.06,4184 3256.06,4136.76 3631.85,4136.76 3631.85,4231.05 3182.46,4231.05 3086.9,4231.05 cw(c3086.9,4270.42) 3047.53,4270.42 3047.53,4284.38 3047.53,4346.05 3047.53,4538.25

## Other copper
Top Layer:
  drawing of 353 lines, arcs and shapes, not listed
Bottom Layer:
  drawing of 341 lines, arcs and shapes, not listed

## Silkscreen, mask and mechanical layers (free items; w line width, h text height)
Top Silkscreen Layer:
  text "S-" at 3071.82,4756.05 h45
  text "S+" at 3216.82,4756.05 h45
Bottom Silkscreen Layer:
  text "ESP-SparkBot" at 3286.82,5491.05 h70.87 r90
  text "V1.1" at 3361.82,5486.05 h70.87 r90

## Text inside footprints (layer, text, board x,y; h text height)
U4: Bottom Silkscreen Layer "1" at 3521.82,4554.75 h59.06 r180